# Allegro board 980K2-260817_261115-1.brd
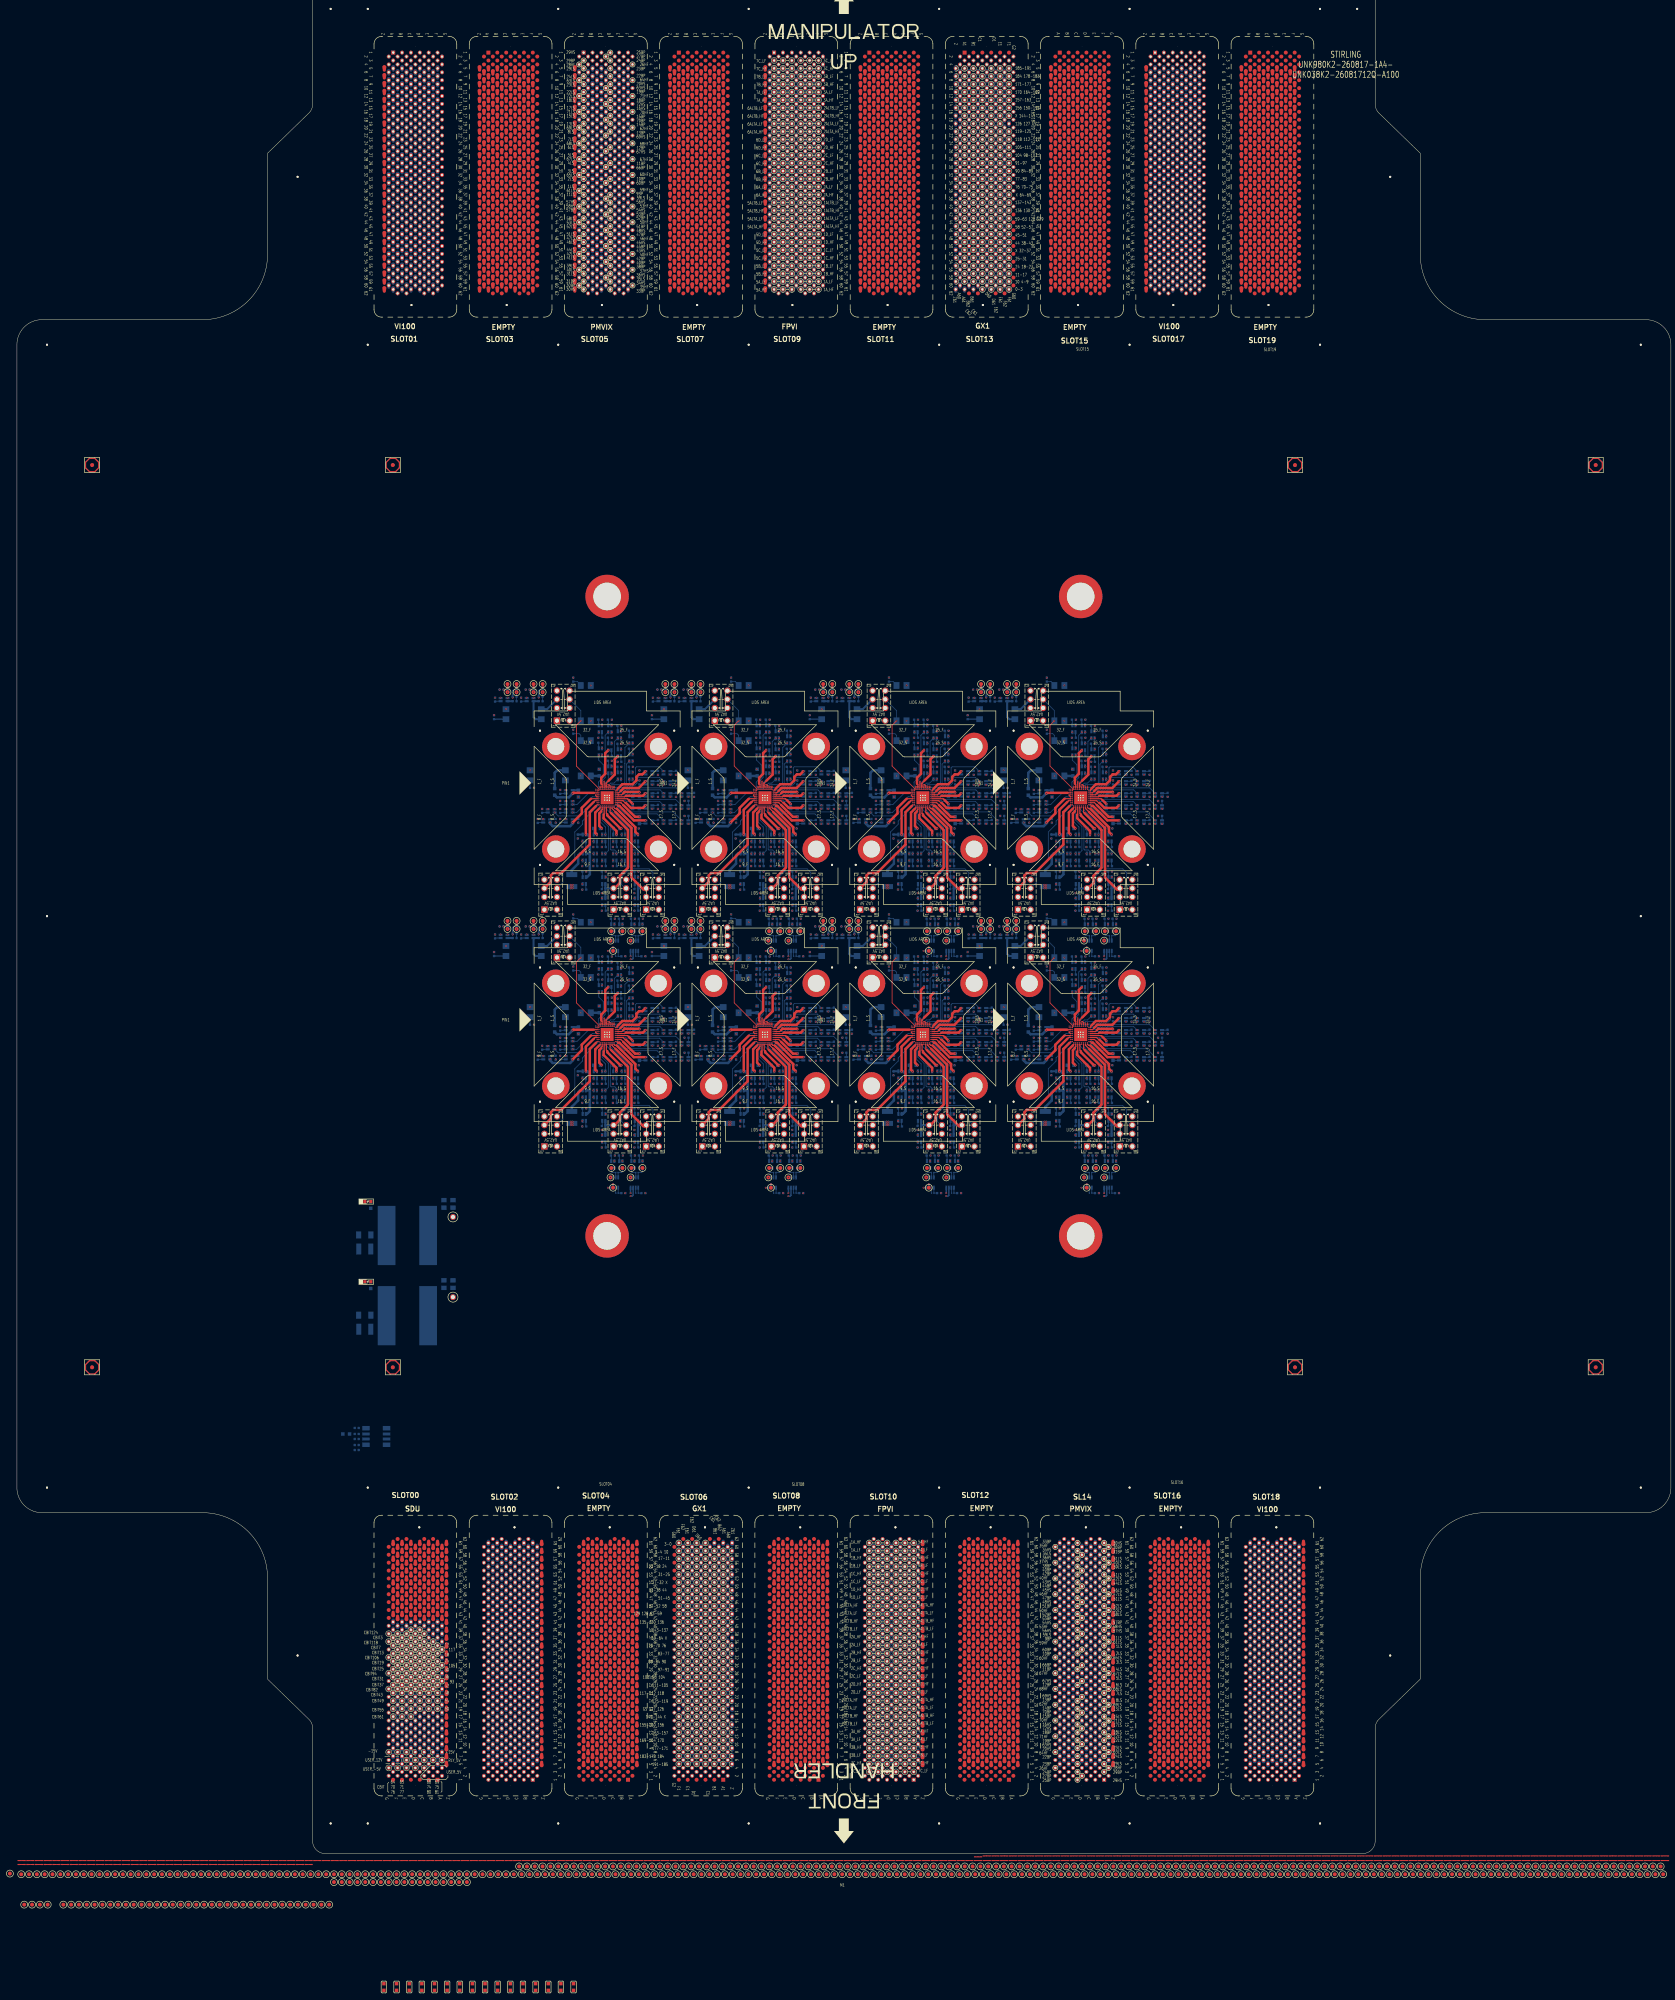
[diagram p0: board, top side]
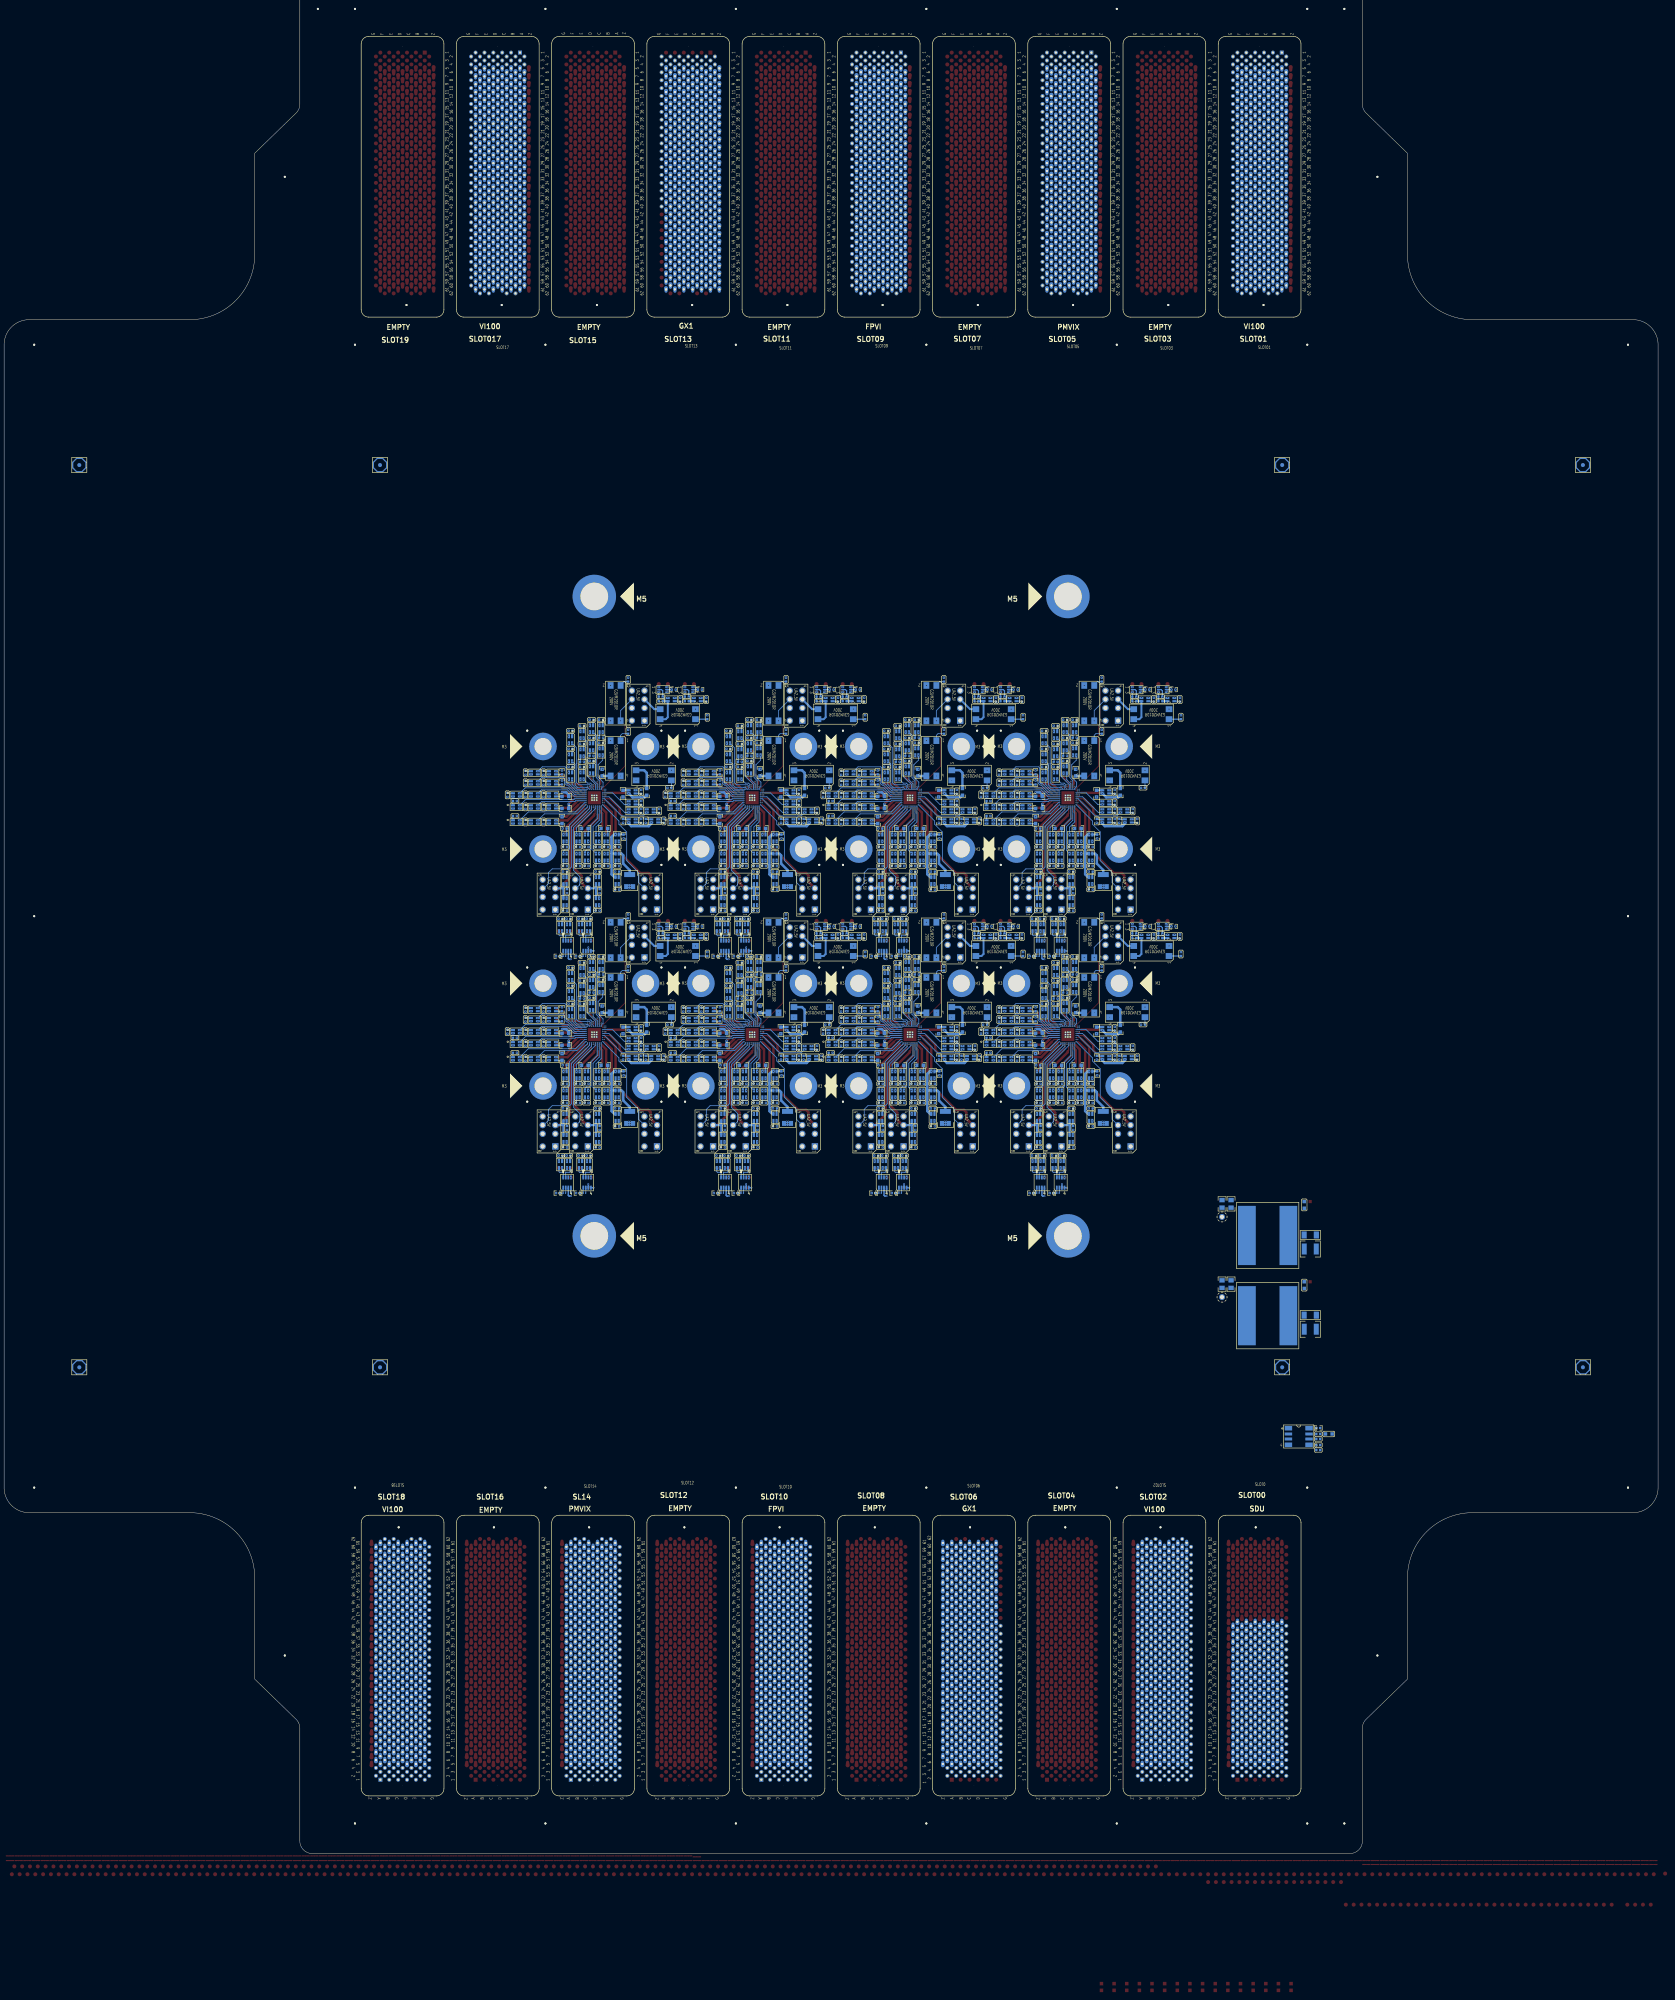
[diagram p1: board, bottom side, seen from below]

Outline 419.1 x 474.98 mm; copper layers: TOP, L02_GND, L03_DP, L04_GND, L05_DP, L06_GND, L07_VI, L08_GND, L09_VI, L10_GND, L11_VI, L12_GND, L13_VI, L14_GND, L15_5V, L16_5V, L17_C-BIT, L18_C-BIT, L19_GND, L20_VI, L21_GND, L22_VI, L23_GND, L24_VI, L25_GND, L26_VI, L27_GND, L28_DP, L29_GND, L30_DP, L31_GND, BOTTOM. Coordinates in mm from the lower left corner of the outline.

## Placement (name value [footprint] x y rotation side)
BC9  0.1U-50-X-S4-TDK  [C0402]  86.11 107.82 180 bottom
BR5  1K-1-S4  [R0402]  86.11 106.3 0 bottom
BR6  1K-1-S4  [R0402]  86.11 103.5 0 bottom
BR7  0-5-S6  [R0603]  83.44 106.3 180 bottom
BR8  0-5-S4  [R0402]  86.11 105.03 180 bottom
BR9  0-5-S4  [R0402]  86.11 102.24 180 bottom
BU1  AT24C512C-SSHM-T-SOIC8  [SO8_206X127MM]  91.06 105.66 180 bottom
C48  0.01U-100-X7R-S6-MU  [C0603]  147.57 273.87 90 bottom
C49  0.01U-100-X7R-S6-MU  [C0603]  136.27 268.99 270 bottom
C50  0.01U-100-X7R-S6-MU  [C0603]  142.28 268.54 270 bottom
C53  1U-16-X5R-S4-YA  [C0402]  142.24 261.62 270 bottom
C54  2.2U-16-X-S4-MU  [C0402]  136.53 261.62 270 bottom
C58  1U-16-X5R-S4-YA  [C0402]  142.11 257.68 270 bottom
C59  4.7U-100-X-SB-MU  [C1210]  140.59 246.51 270 bottom
C60  0.01U-100-X7R-S6-MU  [C0603]  147.01 259.72 0 bottom
C61  0.01U-100-X7R-S6-MU  [C0603]  156.88 264.78 180 bottom
C62  2.2U-16-X-S4-MU  [C0402]  157.07 259.72 0 bottom
C63  0.01U-100-X7R-S6-MU  [C0603]  157.73 261.82 90 bottom
C64  0.01U-100-X7R-S6-MU  [C0603]  156.88 267.82 180 bottom
C65  0.1U-25-X7R-S4-MU  [C0402]  157.73 271.37 90 bottom
C66  0.1U-25-X7R-S4-MU  [C0402]  152.65 276.61 180 bottom
C67  0.1U-25-X7R-S4-MU  [C0402]  150.24 278.13 180 bottom
C68  0.1U-25-X7R-S4-MU  [C0402]  147.83 282.7 180 bottom
C69  0.01U-100-X7R-S6-MU  [C0603]  151.96 259.72 0 bottom
C70  0.1U-25-X7R-S4-MU  [C0402]  122.8 294.89 180 bottom
C71  0.1U-25-X7R-S4-MU  [C0402]  129.42 294.89 180 bottom
C72  0.1U-25-X7R-S4-MU  [C0402]  158.75 227.33 0 bottom
C73  0.1U-25-X7R-S4-MU  [C0402]  153.67 227.33 0 bottom
C74  0.1U-25-X7R-S4-MU  [C0402]  157.73 273.91 90 bottom
CT1  47U-16-X5R-SB-MU  [C1210]  88.14 153.16 180 bottom
CT2  10U-16-X5R-S8-TY  [C0805]  108.2 164.59 90 bottom
CT3  22U-16-X-S8-MU  [C0805]  110.49 164.59 90 bottom
CT7  47U-16-X5R-SB-MU  [C1210]  88.14 132.84 180 bottom
CT8  10U-16-X5R-S8-TY  [C0805]  110.49 144.27 90 bottom
CT9  22U-16-X-S8-MU  [C0805]  108.2 144.27 90 bottom
F1  C1F8-0.25A-SA  [FUSE_1206_H1P05MM]  88.14 156.72 0 bottom
F2  C1F8-0.25A-SA  [FUSE_1206_H1P05MM]  88.14 136.4 0 bottom
FD1  -  [FD_040_V2]  95.25 123.19 0 top
FD2  -  [FD_040_V2]  323.85 123.19 0 top
FD3  -  [FD_040_V2]  323.85 351.79 0 top
FD4  -  [FD_040_V2]  95.25 351.79 0 top
FD5  -  [FD_040_V2]  323.85 123.19 180 bottom
FD6  -  [FD_040_V2]  95.25 123.19 180 bottom
FD7  -  [FD_040_V2]  95.25 351.79 180 bottom
FD8  -  [FD_040_V2]  323.85 351.79 180 bottom
FD9  -  [FD_040_V2]  19.05 123.19 0 top
FD10  -  [FD_040_V2]  400.05 123.19 0 top
FD11  -  [FD_040_V2]  400.05 351.79 0 top
FD12  -  [FD_040_V2]  19.05 351.79 0 top
FD13  -  [FD_040_V2]  400.05 123.19 180 bottom
FD14  -  [FD_040_V2]  19.05 123.19 180 bottom
FD15  -  [FD_040_V2]  19.05 351.79 180 bottom
FD16  -  [FD_040_V2]  400.05 351.79 180 bottom
K1  UA2-5NJ-A-V3  [RL_NECUA2_5V_V3]  138.43 290.63 270 bottom
K2  G3VM-201DR  [RL_G3VM201DR_200V]  144.15 277.5 0 bottom
K3  G3VM-201DR  [RL_G3VM201DR_200V]  134.49 273.18 90 bottom
K4  G3VM-201DR  [RL_G3VM201DR_200V]  144.15 291.47 0 bottom
K5  G3VM-51UR-5V-VSON4  [RL_G3VM_4P_VSON4]  139.95 268.99 0 bottom
K6  G3VM-51UR-5V-VSON4  [RL_G3VM_4P_VSON4]  139.95 266.19 0 bottom
K7  G3VM-51UR-5V-VSON4  [RL_G3VM_4P_VSON4]  139.95 264.16 0 bottom
K8  G3VM-51UR-5V-VSON4  [RL_G3VM_4P_VSON4]  139.95 261.62 0 bottom
K9  G3VM-51UR-5V-VSON4  [RL_G3VM_4P_VSON4]  134.24 261.62 0 bottom
K10  G3VM-51UR-5V-VSON4  [RL_G3VM_4P_VSON4]  135.38 264.16 0 bottom
K11  G3VM-51UR-5V-VSON4  [RL_G3VM_4P_VSON4]  143.76 257.3 90 bottom
K12  G3VM-51UR-5V-VSON4  [RL_G3VM_4P_VSON4]  143.76 252.48 90 bottom
K13  G3VM-51UR-5V-VSON4  [RL_G3VM_4P_VSON4]  143.76 246.51 90 bottom
K14  G3VM-51UR-5V-VSON4  [RL_G3VM_4P_VSON4]  146.56 252.48 90 bottom
K15  UA2-5NJ-A-V3  [RL_NECUA2_5V_V3]  135.25 242.75 270 bottom
K16  G3VM-51UR-5V-VSON4  [RL_G3VM_4P_VSON4]  146.56 257.3 90 bottom
K17  G3VM-51UR-5V-VSON4  [RL_G3VM_4P_VSON4]  148.72 257.3 90 bottom
K18  G3VM-51UR-5V-VSON4  [RL_G3VM_4P_VSON4]  148.72 252.48 90 bottom
K19  G3VM-51UR-5V-VSON4  [RL_G3VM_4P_VSON4]  151.51 257.3 90 bottom
K20  G3VM-51UR-5V-VSON4  [RL_G3VM_4P_VSON4]  151.51 252.48 90 bottom
K21  G3VM-51UR-5V-VSON4  [RL_G3VM_4P_VSON4]  153.67 257.3 90 bottom
K22  G3VM-51UR-5V-VSON4  [RL_G3VM_4P_VSON4]  153.67 252.48 90 bottom
K23  UA2-5NJ-A-V3  [RL_NECUA2_5V_V3]  152.78 242.75 270 bottom
K24  UA2-5NJ-A-V3  [RL_NECUA2_5V_V3]  161.04 242.75 270 bottom
K25  G3VM-51UR-5V-VSON4  [RL_G3VM_4P_VSON4]  156.97 257.3 90 bottom
K26  G3VM-51UR-5V-VSON4  [RL_G3VM_4P_VSON4]  156.97 252.48 90 bottom
K27  G3VM-51UR-5V-VSON4  [RL_G3VM_4P_VSON4]  160.15 261.37 180 bottom
K28  G3VM-51UR-5V-VSON4  [RL_G3VM_4P_VSON4]  164.72 261.37 180 bottom
K29  G3VM-51UR-5V-VSON4  [RL_G3VM_4P_VSON4]  169.29 261.37 180 bottom
K30  G3VM-51UR-5V-VSON4  [RL_G3VM_4P_VSON4]  160.15 265.18 180 bottom
K31  G3VM-51UR-5V-VSON4  [RL_G3VM_4P_VSON4]  164.72 265.18 180 bottom
K32  G3VM-51UR-5V-VSON4  [RL_G3VM_4P_VSON4]  169.29 265.18 180 bottom
K33  G3VM-51UR-5V-VSON4  [RL_G3VM_4P_VSON4]  160.15 268.22 180 bottom
K34  G3VM-51UR-5V-VSON4  [RL_G3VM_4P_VSON4]  164.72 268.22 180 bottom
K35  G3VM-51UR-5V-VSON4  [RL_G3VM_4P_VSON4]  169.29 268.22 180 bottom
K36  G3VM-51UR-5V-VSON4  [RL_G3VM_4P_VSON4]  160.15 271.27 180 bottom
K37  G3VM-51UR-5V-VSON4  [RL_G3VM_4P_VSON4]  164.72 271.27 180 bottom
K38  G3VM-51UR-5V-VSON4  [RL_G3VM_4P_VSON4]  160.15 273.81 180 bottom
K39  G3VM-51UR-5V-VSON4  [RL_G3VM_4P_VSON4]  164.72 273.81 180 bottom
K40  G3VM-51UR-5V-VSON4  [RL_G3VM_4P_VSON4]  155.58 273.05 270 bottom
K41  G3VM-51UR-5V-VSON4  [RL_G3VM_4P_VSON4]  155.58 277.62 270 bottom
K42  G3VM-51UR-5V-VSON4  [RL_G3VM_4P_VSON4]  155.58 282.19 270 bottom
K43  G3VM-51UR-5V-VSON4  [RL_G3VM_4P_VSON4]  152.65 273.05 270 bottom
K44  G3VM-51UR-5V-VSON4  [RL_G3VM_4P_VSON4]  152.65 278.89 270 bottom
K45  G3VM-51UR-5V-VSON4  [RL_G3VM_4P_VSON4]  152.65 283.46 270 bottom
K46  G3VM-51UR-5V-VSON4  [RL_G3VM_4P_VSON4]  150.24 274.57 270 bottom
K47  G3VM-51UR-5V-VSON4  [RL_G3VM_4P_VSON4]  150.24 280.42 270 bottom
K48  G3VM-51UR-5V-VSON4  [RL_G3VM_4P_VSON4]  150.24 284.99 270 bottom
K49  G3VM-51UR-5V-VSON4  [RL_G3VM_4P_VSON4]  147.83 284.99 270 bottom
K50  G3VM-51UR-5V-VSON4  [RL_G3VM_4P_VSON4]  147.83 279.15 270 bottom
K51  G3VM-51UR-5V-VSON4  [RL_G3VM_4P_VSON4]  148.72 246.51 270 bottom
K52  G3VM-51UR-5V-VSON4  [RL_G3VM_4P_VSON4]  148.72 241.17 90 bottom
K53  G3VM-51UR-5V-VSON4  [RL_G3VM_4P_VSON4]  156.97 246.51 270 bottom
K54  G3VM-51UR-5V-VSON4  [RL_G3VM_4P_VSON4]  156.97 241.17 90 bottom
K55  G3VM-51UR-5V-VSON4  [RL_G3VM_4P_VSON4]  123.44 292.35 0 bottom
K56  G3VM-201DR  [RL_G3VM201DR_200V]  128.4 288.67 90 bottom
K57  G3VM-51UR-5V-VSON4  [RL_G3VM_4P_VSON4]  158.12 234.57 270 bottom
K58  G3VM-51UR-5V-VSON4  [RL_G3VM_4P_VSON4]  156.08 234.57 270 bottom
K59  G3VM-51UR-5V-VSON4  [RL_G3VM_4P_VSON4]  153.04 234.57 270 bottom
K60  G3VM-51UR-5V-VSON4  [RL_G3VM_4P_VSON4]  151 234.57 270 bottom
K61  G3VM-51UR-5V-VSON4  [RL_G3VM_4P_VSON4]  130.05 292.35 0 bottom
LD1  LDG-2-S6  [LED_0603]  88.91 165.19 0 top
LD3  LDG-2-S6  [LED_0603]  88.91 144.87 0 top
LT1  L10U-16A-S16.5X15.5-PU  [IND_16P5X15P5MM]  98.93 156.59 0 bottom
LT3  L10U-16A-S16.5X15.5-PU  [IND_16P5X15P5MM]  98.93 136.27 0 bottom
M1  PG_LTXDX_F_X1_OUTLINE_TD_V2  [PG_LTXDX_F_X1_OUTLINE_TD_COHU]  209.55 237.49 0 top
NOREF  -  []  169.17 291.95 0 top
NOREF#2  -  []  231.73 172.54 0 top
NOREF#3  -  []  189.72 281.62 0 top
NOREF#4  -  []  228.32 253.35 0 top
NOREF#5  -  []  272.25 282.59 0 top
NOREF#6  -  []  233.18 211.85 90 top
NOREF#7  -  []  153.27 193.35 0 top
NOREF#8  -  []  288.39 456.29 0 top
NOREF#9  -  []  230.6 173.69 0 top
NOREF#10  -  []  192.66 226.35 90 top
NOREF#11  -  []  230.15 266.89 90 top
NOREF#12  -  []  203.92 229.94 0 top
NOREF#13  -  []  190.97 190.88 90 top
NOREF#14  -  []  249.52 210.32 90 top
NOREF#15  -  []  288.37 18.69 0 top
NOREF#16  -  []  203.97 204.45 90 top
NOREF#17  -  []  266.16 193.35 0 top
NOREF#18  -  []  232.63 233.69 90 top
NOREF#19  -  []  279.06 238.07 0 top
NOREF#20  -  []  163.97 210.55 90 top
NOREF#21  -  []  247.95 226.12 90 top
NOREF#22  -  []  243.97 272 0 top
NOREF#23  -  []  225.61 252.78 0 top
NOREF#24  -  []  302.59 389.27 90 top
NOREF#25  -  []  286.32 272.22 0 top
NOREF#26  -  []  180.83 208.59 90 top
NOREF#27  -  []  199.72 274.65 90 top
NOREF#28  -  []  209.49 280.89 0 top
NOREF#29  -  []  214.51 263.76 0 top
NOREF#30  -  []  186.28 193.03 90 top
NOREF#31  -  []  201.84 235.2 0 top
NOREF#32  -  []  154.39 226.59 90 top
NOREF#33  -  []  239.4 205.9 0 top
NOREF#34  -  []  240.13 396.29 0 top
NOREF#35  -  []  279.27 260.97 90 top
NOREF#36  -  []  179.72 273.6 90 top
NOREF#37  -  []  140.83 201.22 90 top
NOREF#38  -  []  150.6 173.69 90 top
NOREF#39  -  []  190.77 279.22 90 top
NOREF#40  -  []  198.47 82.65 0 top
NOREF#41  -  []  239.72 274.65 90 top
NOREF#42  -  []  201.75 209.17 0 top
NOREF#43  -  []  146.96 191.6 90 top
NOREF#44  -  []  290.89 269.17 0 top
NOREF#45  -  []  176.63 292.23 0 top
NOREF#46  -  []  226.28 253.03 90 top
NOREF#47  -  []  231.24 253.03 90 top
NOREF#48  -  []  213.64 299.09 0 top
NOREF#49  -  []  140.95 204.09 90 top
NOREF#50  -  []  290.89 262.32 0 top
NOREF#51  -  []  269.67 190.01 0 top
NOREF#52  -  []  214.38 204.09 0 top
NOREF#53  -  []  213.75 452.29 90 top
NOREF#54  -  []  197.47 17.15 0 top
NOREF#55  -  []  150.56 247.68 0 top
NOREF#56  -  []  230.77 273.37 90 top
NOREF#57  -  []  149.84 213.7 0 top
NOREF#58  -  []  164.95 272.86 90 top
NOREF#59  -  []  248.42 208.62 0 top
NOREF#60  -  []  203.84 208.62 0 top
NOREF#61  -  []  157.37 196.43 90 top
NOREF#62  -  []  202.57 291.95 0 top
NOREF#63  -  []  212.87 227.4 90 top
NOREF#64  -  []  214.43 292.23 0 top
NOREF#65  -  []  251.65 293.3 90 top
NOREF#66  -  []  277.25 251.93 0 top
NOREF#67  -  []  224.04 196.75 0 top
NOREF#68  -  []  191.11 193.35 0 top
NOREF#69  -  []  257.25 176.5 90 top
NOREF#70  -  []  233.76 255.7 90 top
NOREF#71  -  []  231.95 238.07 0 top
NOREF#72  -  []  191.91 251.6 90 top
NOREF#73  -  []  281.41 227.9 90 top
NOREF#74  -  []  264.26 456.29 0 top
NOREF#75  -  []  145.61 254.08 0 top
NOREF#76  -  []  156.38 241.15 90 top
NOREF#77  -  []  181.55 205.11 90 top
NOREF#78  -  []  214.43 232.23 0 top
NOREF#79  -  []  131.26 244.35 0 top
NOREF#80  -  []  268.78 244.35 0 top
NOREF#81  -  []  195.17 221.32 90 top
NOREF#82  -  []  259.72 213.6 90 top
NOREF#83  -  []  237.25 196.75 0 top
NOREF#84  -  []  192.25 222.59 90 top
NOREF#85  -  []  204.95 260.42 90 top
NOREF#86  -  []  195.68 233.69 90 top
NOREF#87  -  []  144.04 191.93 0 top
NOREF#88  -  []  266.16 200.17 90 top
NOREF#89  -  []  276.57 245.63 0 top
NOREF#90  -  []  226.01 255.7 90 top
NOREF#91  -  []  176.83 227.03 0 top
NOREF#92  -  []  196.81 232.54 0 top
NOREF#93  -  []  180.43 284.38 90 top
NOREF#94  -  []  165.04 293.3 90 top
NOREF#95  -  []  229.72 275.77 0 top
NOREF#96  -  []  212.64 264.47 0 top
NOREF#97  -  []  274.07 191.6 90 top
NOREF#98  -  []  233.76 250.88 90 top
NOREF#99  -  []  273.18 282.26 90 top
NOREF#100  -  []  250.89 202.32 0 top
NOREF#101  -  []  226.16 253.35 0 top
NOREF#102  -  []  161.75 206.13 0 top
NOREF#103  -  []  228.19 187.71 0 top
NOREF#104  -  []  230.77 279.22 90 top
NOREF#105  -  []  147.03 231.4 0 top
NOREF#106  -  []  236.8 285.06 90 top
NOREF#107  -  []  288.42 205.58 0 top
NOREF#108  -  []  268.35 217.95 90 top
NOREF#109  -  []  188.99 256.75 0 top
NOREF#110  -  []  191.98 280.75 90 top
NOREF#111  -  []  258.35 207.01 0 top
NOREF#112  -  []  276.81 172.54 0 top
NOREF#113  -  []  218.97 271.91 90 top
NOREF#114  -  []  263.36 193.35 0 top
NOREF#115  -  []  125.25 291.4 0 top
NOREF#116  -  []  185.41 213.02 90 top
NOREF#117  -  []  148.32 182.05 0 top
NOREF#118  -  []  154.33 207.37 90 top
NOREF#119  -  []  196.57 245.63 0 top
NOREF#120  -  []  136.5 271.94 0 top
NOREF#121  -  []  143.89 185.24 90 top
NOREF#122  -  []  80.49 155.57 0 top
NOREF#123  -  []  155.17 212.18 0 top
NOREF#124  -  []  231.76 227.33 0 top
NOREF#125  -  []  187.8 265.39 90 top
NOREF#126  -  []  201.84 295.2 0 top
NOREF#127  -  []  216 396.29 0 top
NOREF#128  -  []  164.44 292.28 90 top
NOREF#129  -  []  273.6 282.39 0 top
NOREF#130  -  []  244.95 264.23 90 top
NOREF#131  -  []  272.13 224.66 0 top
NOREF#132  -  []  183.36 247.38 0 top
NOREF#133  -  []  294.09 207.27 90 top
NOREF#134  -  []  187.9 265.84 90 top
NOREF#135  -  []  227.77 192.78 0 top
NOREF#136  -  []  251.21 234.89 90 top
NOREF#137  -  []  249.52 200.42 90 top
NOREF#138  -  []  286.32 202.32 0 top
NOREF#139  -  []  233.27 198.18 0 top
NOREF#140  -  []  247.98 286.38 90 top
NOREF#141  -  []  148.44 253.03 90 top
NOREF#142  -  []  188.32 245.63 0 top
NOREF#143  -  []  140.95 201.55 90 top
NOREF#144  -  []  250.02 274.45 0 top
NOREF#145  -  []  234.39 276.17 90 top
NOREF#146  -  []  209.55 237.49 0 top
NOREF#147  -  []  235.17 221.32 90 top
NOREF#148  -  []  226.16 258.18 0 top
NOREF#149  -  []  178.83 292.23 0 top
NOREF#150  -  []  288.42 207.82 90 top
NOREF#151  -  []  147.43 224.11 0 top
NOREF#152  -  []  156.57 245.63 90 top
NOREF#153  -  []  157.18 176.17 90 top
NOREF#154  -  []  197.71 233.69 90 top
NOREF#155  -  []  155.56 175.77 0 top
NOREF#156  -  []  235.15 236.17 90 top
NOREF#157  -  []  180.83 203.76 90 top
NOREF#158  -  []  259.08 208.59 0 top
NOREF#159  -  []  178.35 269.04 0 top
NOREF#160  -  []  249.05 232.28 0 top
NOREF#161  -  []  157.74 166.36 90 top
NOREF#162  -  []  270.77 213.37 90 top
NOREF#163  -  []  197.5 185.31 90 top
NOREF#164  -  []  248.45 295.2 0 top
NOREF#165  -  []  236.57 258.18 0 top
NOREF#166  -  []  193.95 251.93 0 top
NOREF#167  -  []  279.27 265.58 0 top
NOREF#168  -  []  142.88 226.99 0 top
NOREF#169  -  []  136.55 280.49 0 top
NOREF#170  -  []  187.8 204.99 90 top
NOREF#171  -  []  283.97 213.09 90 top
NOREF#172  -  []  199.27 208.62 0 top
NOREF#173  -  []  143.49 197.85 90 top
NOREF#174  -  []  139.08 208.59 0 top
NOREF#175  -  []  220.83 208.59 90 top
NOREF#176  -  []  253.36 201.22 0 top
NOREF#177  -  []  243.97 208.95 0 top
NOREF#178  -  []  239.22 190.88 90 top
NOREF#179  -  []  277.25 180.62 0 top
NOREF#180  -  []  267.3 280.35 0 top
NOREF#181  -  []  163.84 210.87 90 top
NOREF#182  -  []  324.88 21.69 90 top
NOREF#183  -  []  197.25 240.62 0 top
NOREF#184  -  []  184.16 245.63 90 top
NOREF#185  -  []  251.36 18.69 90 top
NOREF#186  -  []  239.72 219.22 90 top
NOREF#187  -  []  288.54 202.09 0 top
NOREF#188  -  []  155.17 221.32 0 top
NOREF#189  -  []  279.4 212 0 top
NOREF#190  -  []  208.42 207.82 90 top
NOREF#191  -  []  259.72 273.6 90 top
NOREF#192  -  []  178.95 208.91 0 top
NOREF#193  -  []  192.25 272.17 90 top
NOREF#194  -  []  168.54 205.9 0 top
NOREF#195  -  []  163.97 267.5 90 top
NOREF#196  -  []  326.72 389.27 90 top
NOREF#197  -  []  142.03 229.03 90 top
NOREF#198  -  []  243.84 271.67 0 top
NOREF#199  -  []  140.83 268.59 90 top
NOREF#200  -  []  131.05 232.28 90 top
NOREF#201  -  []  235.17 272.17 0 top
NOREF#202  -  []  146.43 236.47 90 top
NOREF#203  -  []  243.97 210.55 90 top
NOREF#204  -  []  151.11 253.35 0 top
NOREF#205  -  []  203.84 274.21 0 top
NOREF#206  -  []  140.59 184.98 90 top
NOREF#207  -  []  239.24 184.35 0 top
NOREF#208  -  []  263.36 247.38 0 top
NOREF#209  -  []  197.25 256.75 0 top
NOREF#210  -  []  243.97 260.64 90 top
NOREF#211  -  []  270.48 175.77 0 top
NOREF#212  -  []  187.8 269.99 0 top
NOREF#213  -  []  188.81 250.88 90 top
NOREF#214  -  []  229.12 251.6 90 top
NOREF#215  -  []  147.43 284.11 90 top
NOREF#216  -  []  159.65 272.56 0 top
NOREF#217  -  []  151.98 220.75 90 top
NOREF#218  -  []  249.17 231.95 0 top
NOREF#219  -  []  213.78 207.01 0 top
NOREF#220  -  []  198.91 172.21 90 top
NOREF#221  -  []  188.32 253.35 0 top
NOREF#222  -  []  201.75 269.17 0 top
NOREF#223  -  []  211.21 294.89 90 top
NOREF#224  -  []  179.72 213.6 90 top
NOREF#225  -  []  203.04 176.5 90 top
NOREF#226  -  []  225.61 197.6 0 top
NOREF#227  -  []  237.74 226.35 90 top
NOREF#228  -  []  157.03 178.07 0 top
NOREF#229  -  []  271.11 260.17 90 top
NOREF#230  -  []  190.56 252.78 0 top
NOREF#231  -  []  209.52 272.86 90 top
NOREF#232  -  []  246.32 202.32 0 top
NOREF#233  -  []  179.08 205.79 0 top
NOREF#234  -  []  179.73 238.35 0 top
NOREF#235  -  []  267.05 269.24 0 top
NOREF#236  -  []  224.04 185.96 0 top
NOREF#237  -  []  288.42 265.58 0 top
NOREF#238  -  []  221.55 262.57 90 top
NOREF#239  -  []  156.7 181.72 90 top
NOREF#240  -  []  197.47 17.15 90 top
NOREF#241  -  []  231.91 256.43 90 top
NOREF#242  -  []  215.84 262.57 90 top
NOREF#243  -  []  225.41 286.99 90 top
NOREF#244  -  []  243.84 273.41 90 top
NOREF#245  -  []  268.78 222.65 0 top
NOREF#246  -  []  228.32 258.18 0 top
NOREF#247  -  []  239.22 195.7 90 top
NOREF#248  -  []  254.43 292.23 0 top
NOREF#249  -  []  184.04 185.96 0 top
NOREF#250  -  []  176.72 18.69 0 top
NOREF#251  -  []  149.84 224.11 0 top
NOREF#252  -  []  199.4 204.45 90 top
NOREF#253  -  []  241.75 266.13 0 top
NOREF#254  -  []  191.98 226.59 90 top
NOREF#255  -  []  196.1 271.85 90 top
NOREF#256  -  []  151.24 253.03 90 top
NOREF#257  -  []  183.89 245.24 90 top
NOREF#258  -  []  204.64 241.15 90 top
NOREF#259  -  []  197.37 251.6 90 top
NOREF#260  -  []  155.97 21.69 90 top
NOREF#261  -  []  157.04 244.35 0 top
NOREF#262  -  []  159.22 195.7 90 top
NOREF#263  -  []  137.28 272.5 0 top
NOREF#264  -  []  267.45 209.24 0 top
NOREF#265  -  []  283.84 273.41 90 top
NOREF#266  -  []  276.02 241.47 0 top
NOREF#267  -  []  145.09 257.49 90 top
NOREF#268  -  []  242.26 236.17 90 top
NOREF#269  -  []  228.99 240.62 0 top
NOREF#270  -  []  193.18 282.26 90 top
NOREF#271  -  []  239.27 264.78 90 top
NOREF#272  -  []  119.48 456.29 90 top
NOREF#273  -  []  231.98 220.75 90 top
NOREF#274  -  []  174.09 207.27 90 top
NOREF#275  -  []  203.84 273.41 90 top
NOREF#276  -  []  149.67 190.01 0 top
NOREF#277  -  []  196.45 247.71 0 top
NOREF#278  -  []  277.37 240.3 90 top
NOREF#279  -  []  264.04 245.96 0 top
NOREF#280  -  []  162.87 16.49 0 top
NOREF#281  -  []  268.78 228.49 0 top
NOREF#282  -  []  153.6 222.39 0 top
NOREF#283  -  []  232.25 278.02 0 top
NOREF#284  -  []  178.83 232.23 0 top
NOREF#285  -  []  157.25 256.75 0 top
NOREF#286  -  []  236.7 241.72 90 top
NOREF#287  -  []  232.25 222.59 0 top
NOREF#288  -  []  276.1 276.42 90 top
NOREF#289  -  []  271.91 196.43 90 top
NOREF#290  -  []  185.09 197.49 90 top
NOREF#291  -  []  281.12 188.11 90 top
NOREF#292  -  []  192.63 233.69 0 top
NOREF#293  -  []  169.05 292.28 0 top
NOREF#294  -  []  283.84 260.97 90 top
NOREF#295  -  []  249.52 212.86 90 top
NOREF#296  -  []  159.72 219.22 90 top
NOREF#297  -  []  151.53 233.37 90 top
NOREF#298  -  []  234.78 236.5 90 top
NOREF#299  -  []  269.24 185.31 90 top
NOREF#300  -  []  148.78 184.35 0 top
NOREF#301  -  []  279.4 268.95 0 top
NOREF#302  -  []  253.64 239.09 0 top
NOREF#303  -  []  156.38 181.15 90 top
NOREF#304  -  []  199.72 214.65 90 top
NOREF#305  -  []  164.44 232.28 90 top
NOREF#306  -  []  149.29 279.37 0 top
NOREF#307  -  []  134.07 210.89 90 top
NOREF#308  -  []  269.84 213.7 90 top
NOREF#309  -  []  143.61 396.29 0 top
NOREF#310  -  []  231.19 228.49 0 top
NOREF#311  -  []  171.22 234.24 90 top
NOREF#312  -  []  136.55 194.49 90 top
NOREF#313  -  []  268.32 245.63 0 top
NOREF#314  -  []  125.38 226.23 0 top
NOREF#315  -  []  231.24 193.03 90 top
NOREF#316  -  []  186.83 191.93 0 top
NOREF#317  -  []  186.83 256.75 0 top
NOREF#318  -  []  209.52 204.23 90 top
NOREF#319  -  []  196.52 221.12 0 top
NOREF#320  -  []  242.44 292.28 0 top
NOREF#321  -  []  195.17 272.17 0 top
NOREF#322  -  []  163.97 268.95 0 top
NOREF#323  -  []  230.48 235.77 0 top
NOREF#324  -  []  218.95 266.12 0 top
NOREF#325  -  []  191.95 178.07 0 top
NOREF#326  -  []  199.27 213.41 90 top
NOREF#327  -  []  248.42 267.82 90 top
NOREF#328  -  []  277.03 178.07 0 top
NOREF#329  -  []  277.25 191.93 0 top
NOREF#330  -  []  271.11 258.18 0 top
NOREF#331  -  []  138.35 209.04 0 top
NOREF#332  -  []  235.05 218.82 0 top
NOREF#333  -  []  275.51 454.29 90 top
NOREF#334  -  []  258.85 181.15 90 top
NOREF#335  -  []  260.95 201.55 90 top
NOREF#336  -  []  135.15 268.04 0 top
NOREF#337  -  []  163.84 270.87 90 top
NOREF#338  -  []  262.81 257.6 0 top
NOREF#339  -  []  132.26 237.5 0 top
NOREF#340  -  []  231.53 233.37 90 top
NOREF#341  -  []  239.72 279.22 90 top
NOREF#342  -  []  192.25 278.02 90 top
NOREF#343  -  []  138.56 246.51 0 top
NOREF#344  -  []  279.06 178.07 0 top
NOREF#345  -  []  226.83 196.75 0 top
NOREF#346  -  []  175.84 202.57 90 top
NOREF#347  -  []  323.77 454.29 90 top
NOREF#348  -  []  271.76 227.33 0 top
NOREF#349  -  []  232.66 226.35 90 top
NOREF#350  -  []  274.39 282.02 90 top
NOREF#351  -  []  228.78 244.35 0 top
NOREF#352  -  []  279.44 179.15 0 top
NOREF#353  -  []  222.03 289.03 90 top
NOREF#354  -  []  190.77 219.22 90 top
NOREF#355  -  []  134.43 232.23 0 top
NOREF#356  -  []  152.72 192.78 0 top
NOREF#357  -  []  258.35 264.47 0 top
NOREF#358  -  []  155.15 176.17 90 top
NOREF#359  -  []  191.19 278.07 0 top
NOREF#360  -  []  136.38 204.09 90 top
NOREF#361  -  []  165.04 233.3 90 top
NOREF#362  -  []  124.11 392.33 90 top
NOREF#363  -  []  236.57 185.63 0 top
NOREF#364  -  []  88.44 107.76 0 top
NOREF#365  -  []  134.38 204.09 0 top
NOREF#366  -  []  267.43 224.11 0 top
NOREF#367  -  []  239.4 208.95 0 top
NOREF#368  -  []  203.84 214.21 0 top
NOREF#369  -  []  239.4 262.09 0 top
NOREF#370  -  []  275.92 255.7 90 top
NOREF#371  -  []  276.02 252.78 0 top
NOREF#372  -  []  157.04 184.35 0 top
NOREF#373  -  []  156.52 216.55 0 top
NOREF#374  -  []  221.59 234.15 0 top
NOREF#375  -  []  222.81 186.81 0 top
NOREF#376  -  []  294.09 260.42 90 top
NOREF#377  -  []  163.84 201.77 0 top
NOREF#378  -  []  276.8 285.06 90 top
NOREF#379  -  []  195.05 223.39 0 top
NOREF#380  -  []  227.43 284.11 0 top
NOREF#381  -  []  151.11 200.17 90 top
NOREF#382  -  []  230.56 257.6 0 top
NOREF#383  -  []  149.21 17.15 0 top
NOREF#384  -  []  133.45 184.35 0 top
NOREF#385  -  []  284.95 260.42 90 top
NOREF#386  -  []  232.63 172.86 0 top
NOREF#387  -  []  152.13 280.09 0 top
NOREF#388  -  []  231.11 253.35 0 top
NOREF#389  -  []  269.84 224.11 0 top
NOREF#390  -  []  213.45 244.35 0 top
NOREF#391  -  []  186.96 191.6 90 top
NOREF#392  -  []  269.12 251.6 90 top
NOREF#393  -  []  224.16 251.6 90 top
NOREF#394  -  []  188.95 266.89 0 top
NOREF#395  -  []  266.96 256.43 90 top
NOREF#396  -  []  259.55 240.49 90 top
NOREF#397  -  []  130.02 214.45 0 top
NOREF#398  -  []  134.38 264.09 0 top
NOREF#399  -  []  157.59 175.77 0 top
NOREF#400  -  []  267.77 257.6 0 top
NOREF#401  -  []  246.32 274.76 0 top
NOREF#402  -  []  269.12 196.43 90 top
NOREF#403  -  []  219.08 261.22 0 top
NOREF#404  -  []  189.84 219.54 90 top
NOREF#405  -  []  195.68 173.69 0 top
NOREF#406  -  []  159.4 210.55 90 top
NOREF#407  -  []  175.24 201.55 90 top
NOREF#408  -  []  139.49 266.31 90 top
NOREF#409  -  []  191.91 256.43 90 top
NOREF#410  -  []  215.24 261.55 90 top
NOREF#411  -  []  283.97 272 0 top
NOREF#412  -  []  205.38 286.23 0 top
NOREF#413  -  []  267.9 205.84 90 top
NOREF#414  -  []  199.44 179.15 0 top
NOREF#415  -  []  258.83 232.23 0 top
NOREF#416  -  []  276.57 185.63 0 top
NOREF#417  -  []  186.28 197.85 90 top
NOREF#418  -  []  146.17 226.14 90 top
NOREF#419  -  []  192.25 222.59 0 top
NOREF#420  -  []  192.13 220.09 0 top
NOREF#421  -  []  279.4 267.5 90 top
NOREF#422  -  []  231.46 167 0 top
NOREF#423  -  []  147.9 205.84 90 top
NOREF#424  -  []  159.27 267.82 90 top
NOREF#425  -  []  155.05 278.82 0 top
NOREF#426  -  []  149.72 215.77 0 top
NOREF#427  -  []  14.6 372.12 0 top
NOREF#428  -  []  164.95 260.42 90 top
NOREF#429  -  []  228.99 256.75 0 top
NOREF#430  -  []  135.24 261.55 90 top
NOREF#431  -  []  173.78 267.01 0 top
NOREF#432  -  []  218.95 268.91 0 top
NOREF#433  -  []  141.55 205.11 90 top
NOREF#434  -  []  151.98 226.59 90 top
NOREF#435  -  []  234.39 282.02 90 top
NOREF#436  -  []  227.9 205.84 90 top
NOREF#437  -  []  275.68 233.69 90 top
NOREF#438  -  []  276.1 280.99 90 top
NOREF#439  -  []  231.24 257.85 90 top
NOREF#440  -  []  213.65 239.15 0 top
NOREF#441  -  []  204.64 181.15 90 top
NOREF#442  -  []  196.57 185.63 0 top
NOREF#443  -  []  193.18 277.69 90 top
NOREF#444  -  []  172.37 392.33 90 top
NOREF#445  -  []  219.72 213.6 90 top
NOREF#446  -  []  226.01 250.88 90 top
NOREF#447  -  []  233.6 282.39 0 top
NOREF#448  -  []  257.29 187.78 0 top
NOREF#449  -  []  196.84 227.33 0 top
NOREF#450  -  []  251.25 184.35 0 top
NOREF#451  -  []  192.13 280.09 0 top
NOREF#452  -  []  268.32 182.05 0 top
NOREF#453  -  []  149.12 251.6 90 top
NOREF#454  -  []  206.32 214.76 0 top
NOREF#455  -  []  258.95 268.91 0 top
NOREF#456  -  []  237.71 233.69 90 top
NOREF#457  -  []  236.52 281.12 0 top
NOREF#458  -  []  159.27 271.67 0 top
NOREF#459  -  []  265.61 192.78 0 top
NOREF#460  -  []  307.65 17.78 0 top
NOREF#461  -  []  209.55 237.49 0 top
NOREF#462  -  []  164.95 207.27 90 top
NOREF#463  -  []  232.25 218.02 0 top
NOREF#464  -  []  249.52 267.27 90 top
NOREF#465  -  []  161.44 184.35 0 top
NOREF#466  -  []  216.83 287.03 0 top
NOREF#467  -  []  275.17 276.75 90 top
NOREF#468  -  []  142.88 286.99 0 top
NOREF#469  -  []  261.55 269.94 90 top
NOREF#470  -  []  178.97 211.91 90 top
NOREF#471  -  []  229.12 256.43 90 top
NOREF#472  -  []  109.55 389.27 90 top
NOREF#473  -  []  161.41 227.9 90 top
NOREF#474  -  []  270.56 252.78 0 top
NOREF#475  -  []  181.55 209.94 90 top
NOREF#476  -  []  237.71 172.86 0 top
NOREF#477  -  []  188.32 245.63 90 top
NOREF#478  -  []  234.33 264.33 90 top
NOREF#479  -  []  219.08 268.59 0 top
NOREF#480  -  []  185.42 214.72 90 top
NOREF#481  -  []  271.76 167.33 0 top
NOREF#482  -  []  249.52 270.32 90 top
NOREF#483  -  []  149.29 286.59 90 top
NOREF#484  -  []  239.4 260.64 90 top
NOREF#485  -  []  232.13 284.66 0 top
NOREF#486  -  []  186.16 212.17 90 top
NOREF#487  -  []  235.68 233.69 90 top
NOREF#488  -  []  233.6 222.39 0 top
NOREF#489  -  []  309.55 14.59 90 top
NOREF#490  -  []  199.4 267.5 90 top
NOREF#491  -  []  220.95 208.91 90 top
NOREF#492  -  []  149.72 286.19 0 top
NOREF#493  -  []  222.81 246.81 0 top
NOREF#494  -  []  187.3 280.35 0 top
NOREF#495  -  []  219.73 238.35 0 top
NOREF#496  -  []  173.64 299.09 0 top
NOREF#497  -  []  235.49 228.7 90 top
NOREF#498  -  []  195.17 216.75 0 top
NOREF#499  -  []  176.98 265.11 90 top
NOREF#500  -  []  175.84 262.57 90 top
NOREF#501  -  []  219.55 240.49 90 top
NOREF#502  -  []  116.51 14.59 90 top
NOREF#503  -  []  214.38 264.09 0 top
NOREF#504  -  []  124.32 231.95 90 top
NOREF#505  -  []  181.6 248.12 0 top
NOREF#506  -  []  256.98 205.11 90 top
NOREF#507  -  []  266.01 195.7 90 top
NOREF#508  -  []  143.36 247.38 0 top
NOREF#509  -  []  206.32 202.32 0 top
NOREF#510  -  []  144.16 256.43 90 top
NOREF#511  -  []  157.04 244.35 0 top
NOREF#512  -  []  266.69 283.04 90 top
NOREF#513  -  []  184.04 245.96 0 top
NOREF#514  -  []  265.09 257.49 90 top
NOREF#515  -  []  260.95 204.09 90 top
NOREF#516  -  []  270.77 283.79 90 top
NOREF#517  -  []  254.38 204.09 0 top
NOREF#518  -  []  262.81 197.6 0 top
NOREF#519  -  []  254.04 210.63 90 top
NOREF#520  -  []  190.41 228.7 90 top
NOREF#521  -  []  124.61 294.89 90 top
NOREF#522  -  []  266.28 193.03 90 top
NOREF#523  -  []  168.42 205.58 0 top
NOREF#524  -  []  203.97 268.95 0 top
NOREF#525  -  []  168.54 207.5 90 top
NOREF#526  -  []  196.8 220.49 90 top
NOREF#527  -  []  189.72 275.77 0 top
NOREF#528  -  []  255.65 184.35 0 top
NOREF#529  -  []  270.6 173.69 0 top
NOREF#530  -  []  170.89 206.13 0 top
NOREF#531  -  []  277.04 184.35 0 top
NOREF#532  -  []  162.85 297.22 0 top
NOREF#533  -  []  232.13 274.25 0 top
NOREF#534  -  []  224.04 245.96 0 top
NOREF#535  -  []  243.84 208.62 0 top
NOREF#536  -  []  149.21 17.15 90 top
NOREF#537  -  []  193.6 286.96 0 top
NOREF#538  -  []  212.64 204.47 0 top
NOREF#539  -  []  163.84 264.78 90 top
NOREF#540  -  []  169.52 264.23 90 top
NOREF#541  -  []  224.16 196.43 90 top
NOREF#542  -  []  232.51 235.77 0 top
NOREF#543  -  []  146.88 280.75 90 top
NOREF#544  -  []  208.54 262.09 0 top
NOREF#545  -  []  266.83 251.93 0 top
NOREF#546  -  []  215.24 201.55 90 top
NOREF#547  -  []  284.95 207.27 90 top
NOREF#548  -  []  138.95 208.91 0 top
NOREF#549  -  []  230.6 233.69 90 top
NOREF#550  -  []  258.35 267.01 0 top
NOREF#551  -  []  167.95 286.12 90 top
NOREF#552  -  []  139.08 268.59 0 top
NOREF#553  -  []  154.62 247.68 90 top
NOREF#554  -  []  270.98 184.35 0 top
NOREF#555  -  []  276.8 214.65 90 top
NOREF#556  -  []  228.35 223.79 90 top
NOREF#557  -  []  159.27 265.58 0 top
NOREF#558  -  []  186.16 286.14 90 top
NOREF#559  -  []  190.97 179.57 90 top
NOREF#560  -  []  185.41 286.99 90 top
NOREF#561  -  []  174.09 260.42 90 top
NOREF#562  -  []  171.65 233.3 90 top
NOREF#563  -  []  173.36 201.22 0 top
NOREF#564  -  []  256.55 194.49 90 top
NOREF#565  -  []  266.43 236.47 90 top
NOREF#566  -  []  243.84 260.97 90 top
NOREF#567  -  []  244.95 260.42 90 top
NOREF#568  -  []  288.54 265.9 0 top
NOREF#569  -  []  193.39 197.85 90 top
NOREF#570  -  []  276.02 192.78 0 top
NOREF#571  -  []  265.61 252.78 0 top
NOREF#572  -  []  156.7 253.03 90 top
NOREF#573  -  []  235.92 190.88 90 top
NOREF#574  -  []  193.27 193.35 0 top
NOREF#575  -  []  195.17 212.18 0 top
NOREF#576  -  []  197.25 196.75 0 top
NOREF#577  -  []  164.61 234.89 90 top
NOREF#578  -  []  142.88 213.02 0 top
NOREF#579  -  []  124.61 234.24 90 top
NOREF#580  -  []  238.91 232.21 90 top
NOREF#581  -  []  195.49 168.7 90 top
NOREF#582  -  []  240.23 236.17 90 top
NOREF#583  -  []  185.41 273.02 90 top
NOREF#584  -  []  139.08 261.22 0 top
NOREF#585  -  []  209.55 237.49 0 top
NOREF#586  -  []  241.12 248.11 90 top
NOREF#587  -  []  246.32 209.17 0 top
NOREF#588  -  []  223.36 187.38 0 top
NOREF#589  -  []  168.45 235.2 0 top
NOREF#590  -  []  163.97 208.95 0 top
NOREF#591  -  []  169.49 280.89 0 top
NOREF#592  -  []  243.97 214.54 0 top
NOREF#593  -  []  220.83 261.22 90 top
NOREF#594  -  []  181.94 389.27 90 top
NOREF#595  -  []  95.33 18.69 0 top
NOREF#596  -  []  275.05 283.39 0 top
NOREF#597  -  []  281.75 202.32 0 top
NOREF#598  -  []  175.11 201.22 90 top
NOREF#599  -  []  260.83 265.79 90 top
NOREF#600  -  []  146.7 237.02 90 top
NOREF#601  -  []  163.84 273.41 90 top
NOREF#602  -  []  288.54 268.95 0 top
NOREF#603  -  []  144.04 251.93 0 top
NOREF#604  -  []  152.72 197.6 0 top
NOREF#605  -  []  197.74 166.36 90 top
NOREF#606  -  []  199.22 255.7 90 top
NOREF#607  -  []  146.28 257.85 90 top
NOREF#608  -  []  180.95 208.91 90 top
NOREF#609  -  []  217.25 176.5 90 top
NOREF#610  -  []  283.84 270.87 90 top
NOREF#611  -  []  189.67 190.01 0 top
NOREF#612  -  []  147.8 205.39 90 top
NOREF#613  -  []  231.71 171.3 0 top
NOREF#614  -  []  197.37 240.3 90 top
NOREF#615  -  []  244.95 267.27 90 top
NOREF#616  -  []  233.03 172.1 0 top
NOREF#617  -  []  154.78 176.5 90 top
NOREF#618  -  []  156.57 185.63 0 top
NOREF#619  -  []  157.25 191.93 0 top
NOREF#620  -  []  233.27 258.18 0 top
NOREF#621  -  []  239.27 204.78 90 top
NOREF#622  -  []  234.39 216.17 90 top
NOREF#623  -  []  218.35 209.04 0 top
NOREF#624  -  []  149.72 281.62 0 top
NOREF#625  -  []  157.74 226.35 90 top
NOREF#626  -  []  245.04 293.3 90 top
NOREF#627  -  []  152.87 188.11 90 top
NOREF#628  -  []  188.32 258.18 0 top
NOREF#629  -  []  168.42 201.77 0 top
NOREF#630  -  []  185.61 192.78 0 top
NOREF#631  -  []  196.5 392.33 90 top
NOREF#632  -  []  196.8 280.49 90 top
NOREF#633  -  []  170.89 262.32 0 top
NOREF#634  -  []  204.95 204.23 90 top
NOREF#635  -  []  201.44 184.35 0 top
NOREF#636  -  []  232.63 173.69 90 top
NOREF#637  -  []  229.12 191.6 90 top
NOREF#638  -  []  95.35 452.29 90 top
NOREF#639  -  []  146.28 197.85 90 top
NOREF#640  -  []  156.57 193.35 0 top
NOREF#641  -  []  141.55 207.14 90 top
NOREF#642  -  []  286.32 212.22 0 top
NOREF#643  -  []  159.27 264.78 90 top
NOREF#644  -  []  276.02 257.6 0 top
NOREF#645  -  []  262.87 213.02 0 top
NOREF#646  -  []  191.98 220.75 90 top
NOREF#647  -  []  277.37 196.43 90 top
NOREF#648  -  []  274.39 286.59 90 top
NOREF#649  -  []  193.18 217.69 90 top
NOREF#650  -  []  229.12 240.3 90 top
NOREF#651  -  []  135.15 260.67 90 top
NOREF#652  -  []  168.42 264.78 90 top
NOREF#653  -  []  237.25 256.75 0 top
NOREF#654  -  []  203.92 289.94 0 top
NOREF#655  -  []  197.71 173.69 0 top
NOREF#656  -  []  153.56 233.37 90 top
NOREF#657  -  []  167.04 239.09 0 top
NOREF#658  -  []  248.54 208.95 0 top
NOREF#659  -  []  152.63 173.69 0 top
NOREF#660  -  []  235.17 272.17 90 top
NOREF#661  -  []  219.73 178.35 0 top
NOREF#662  -  []  221.55 269.94 90 top
NOREF#663  -  []  168.42 260.97 90 top
NOREF#664  -  []  279.72 223.79 90 top
NOREF#665  -  []  279.72 279.22 90 top
NOREF#666  -  []  239.27 214.21 0 top
NOREF#667  -  []  188.35 223.79 90 top
NOREF#668  -  []  133.66 179.15 0 top
NOREF#669  -  []  143.36 187.38 0 top
NOREF#670  -  []  241.12 188.11 90 top
NOREF#671  -  []  192.72 257.6 0 top
NOREF#672  -  []  283.84 274.21 0 top
NOREF#673  -  []  229.84 224.11 0 top
NOREF#674  -  []  159.27 213.41 90 top
NOREF#675  -  []  193.76 195.7 90 top
NOREF#676  -  []  101.95 82.65 0 top
NOREF#677  -  []  272.63 233.69 0 top
NOREF#678  -  []  249.52 207.27 90 top
NOREF#679  -  []  204.44 292.28 90 top
NOREF#680  -  []  159.27 200.97 90 top
NOREF#681  -  []  187.99 178.35 0 top
NOREF#682  -  []  237.71 233.69 0 top
NOREF#683  -  []  244.61 294.24 90 top
NOREF#684  -  []  203.97 212 0 top
NOREF#685  -  []  171.05 289.49 0 top
NOREF#686  -  []  263.36 187.38 0 top
NOREF#687  -  []  152.51 235.77 0 top
NOREF#688  -  []  267.77 197.6 0 top
NOREF#689  -  []  176.98 205.11 90 top
NOREF#690  -  []  159.4 207.5 90 top
NOREF#691  -  []  203.4 236.38 0 top
NOREF#692  -  []  196.7 193.03 90 top
NOREF#693  -  []  155.05 223.39 0 top
NOREF#694  -  []  235.17 216.75 90 top
NOREF#695  -  []  187.77 192.78 0 top
NOREF#696  -  []  197.37 180.3 90 top
NOREF#697  -  []  141.55 202.57 90 top
NOREF#698  -  []  186.28 253.03 90 top
NOREF#699  -  []  188.44 253.03 90 top
NOREF#700  -  []  198.64 233.37 90 top
NOREF#701  -  []  235.96 228.6 90 top
NOREF#702  -  []  128.48 456.29 0 top
NOREF#703  -  []  237.37 191.6 90 top
NOREF#704  -  []  168.42 261.77 0 top
NOREF#705  -  []  228.44 193.03 90 top
NOREF#706  -  []  199.4 260.64 90 top
NOREF#707  -  []  159.06 238.07 0 top
NOREF#708  -  []  195.05 278.82 0 top
NOREF#709  -  []  156.79 171.3 0 top
NOREF#710  -  []  157.37 180.3 90 top
NOREF#711  -  []  187.05 209.24 0 top
NOREF#712  -  []  237.03 238.07 0 top
NOREF#713  -  []  155.17 276.75 0 top
NOREF#714  -  []  211.25 244.35 0 top
NOREF#715  -  []  189.84 224.11 0 top
NOREF#716  -  []  237.04 184.35 0 top
NOREF#717  -  []  118.64 291.4 90 top
NOREF#718  -  []  236.33 227.9 90 top
NOREF#719  -  []  193.76 250.88 90 top
NOREF#720  -  []  230.97 190.88 90 top
NOREF#721  -  []  174.51 263.76 0 top
NOREF#722  -  []  272.11 171.4 0 top
NOREF#723  -  []  269.84 219.54 90 top
NOREF#724  -  []  144.04 256.75 0 top
NOREF#725  -  []  266.83 196.75 0 top
NOREF#726  -  []  199.24 244.35 0 top
NOREF#727  -  []  277.03 238.07 0 top
NOREF#728  -  []  148.35 223.79 90 top
NOREF#729  -  []  191.79 251.93 0 top
NOREF#730  -  []  168.45 295.2 0 top
NOREF#731  -  []  226.7 223.05 90 top
NOREF#732  -  []  190.73 19.69 90 top
NOREF#733  -  []  226.28 197.85 90 top
NOREF#734  -  []  239.4 212 0 top
NOREF#735  -  []  153.39 253.03 90 top
NOREF#736  -  []  241.75 209.17 0 top
NOREF#737  -  []  155.05 214.25 0 top
NOREF#738  -  []  242.2 178.35 0 top
NOREF#739  -  []  229.55 248.99 90 top
NOREF#740  -  []  273.56 233.37 90 top
NOREF#741  -  []  194.33 267.37 90 top
NOREF#742  -  []  278.64 173.37 90 top
NOREF#743  -  []  228.44 197.85 90 top
NOREF#744  -  []  159.27 210.87 90 top
NOREF#745  -  []  283.97 264.45 90 top
NOREF#746  -  []  168.54 202.09 0 top
NOREF#747  -  []  233.18 244.35 0 top
NOREF#748  -  []  216.38 264.09 90 top
NOREF#749  -  []  284.95 204.23 90 top
NOREF#750  -  []  226.83 191.93 0 top
NOREF#751  -  []  150.41 168.7 90 top
NOREF#752  -  []  277.5 245.31 90 top
NOREF#753  -  []  159.4 272 0 top
NOREF#754  -  []  147.8 204.99 90 top
NOREF#755  -  []  219.73 178.35 0 top
NOREF#756  -  []  275.68 173.69 90 top
NOREF#757  -  []  273.6 276.55 0 top
NOREF#758  -  []  227.45 209.24 0 top
NOREF#759  -  []  139.08 201.22 0 top
NOREF#760  -  []  159.27 273.41 90 top
NOREF#761  -  []  236.84 167.33 0 top
NOREF#762  -  []  271.95 238.07 0 top
NOREF#763  -  []  201.75 266.13 0 top
NOREF#764  -  []  179.08 203.76 0 top
NOREF#765  -  []  195.58 262.67 90 top
NOREF#766  -  []  158.91 172.21 90 top
NOREF#767  -  []  228.81 255.7 90 top
NOREF#768  -  []  138.95 264.09 0 top
NOREF#769  -  []  289.52 264.23 90 top
NOREF#770  -  []  196.1 276.42 90 top
NOREF#771  -  []  281.75 262.32 0 top
NOREF#772  -  []  266.28 253.03 90 top
NOREF#773  -  []  189.12 191.6 90 top
NOREF#774  -  []  259.08 201.22 0 top
NOREF#775  -  []  155.05 274.25 0 top
NOREF#776  -  []  208.54 202.09 0 top
NOREF#777  -  []  230.98 244.35 0 top
NOREF#778  -  []  196.61 173.37 90 top
NOREF#779  -  []  271.53 233.37 90 top
NOREF#780  -  []  222.81 252.78 0 top
NOREF#781  -  []  148.19 187.71 0 top
NOREF#782  -  []  283.97 267.5 90 top
NOREF#783  -  []  157.71 173.69 90 top
NOREF#784  -  []  288.42 204.78 90 top
NOREF#785  -  []  133.36 261.22 0 top
NOREF#786  -  []  210.89 269.17 0 top
NOREF#787  -  []  193.56 233.37 90 top
NOREF#788  -  []  274.39 222.02 90 top
NOREF#789  -  []  203.97 274.54 0 top
NOREF#790  -  []  194.39 226.59 90 top
NOREF#791  -  []  283.97 273.09 90 top
NOREF#792  -  []  156.8 214.65 90 top
NOREF#793  -  []  231.11 258.18 0 top
NOREF#794  -  []  154.07 251.6 90 top
NOREF#795  -  []  241.75 212.22 0 top
NOREF#796  -  []  225.41 273.02 90 top
NOREF#797  -  []  272.25 212.18 90 top
NOREF#798  -  []  193.18 184.35 0 top
NOREF#799  -  []  181.55 269.94 90 top
NOREF#800  -  []  147.99 178.35 0 top
NOREF#801  -  []  142.88 273.02 0 top
NOREF#802  -  []  143.49 253.03 90 top
NOREF#803  -  []  196.8 274.65 90 top
NOREF#804  -  []  256.63 292.23 0 top
NOREF#805  -  []  283.84 210.87 90 top
NOREF#806  -  []  239.27 205.58 0 top
NOREF#807  -  []  199.72 219.22 90 top
NOREF#808  -  []  277.71 233.69 0 top
NOREF#809  -  []  132.55 284.49 0 top
NOREF#810  -  []  196.57 193.35 0 top
NOREF#811  -  []  184.16 196.43 90 top
NOREF#812  -  []  208.54 207.5 90 top
NOREF#813  -  []  247.04 299.09 0 top
NOREF#814  -  []  245.38 226.23 0 top
NOREF#815  -  []  279.72 274.65 90 top
NOREF#816  -  []  194.39 216.17 90 top
NOREF#817  -  []  187.43 278.27 0 top
NOREF#818  -  []  237.18 176.17 90 top
NOREF#819  -  []  140.95 206.12 90 top
NOREF#820  -  []  277.71 173.69 90 top
NOREF#821  -  []  153.03 172.1 0 top
NOREF#822  -  []  266.16 212.17 90 top
NOREF#823  -  []  137.28 286.47 90 top
NOREF#824  -  []  114.61 17.78 0 top
NOREF#825  -  []  158.64 233.37 90 top
NOREF#826  -  []  253.24 261.55 0 top
NOREF#827  -  []  152.13 284.66 0 top
NOREF#828  -  []  276.57 193.35 0 top
NOREF#829  -  []  188.32 185.63 90 top
NOREF#830  -  []  247.04 239.09 0 top
NOREF#831  -  []  216.63 232.23 0 top
NOREF#832  -  []  175.24 261.55 90 top
NOREF#833  -  []  281.44 184.35 0 top
NOREF#834  -  []  135.15 265.24 0 top
NOREF#835  -  []  129.36 361.96 0 top
NOREF#836  -  []  244.95 204.23 90 top
NOREF#837  -  []  149.12 180.3 90 top
NOREF#838  -  []  272.72 197.6 0 top
NOREF#839  -  []  269.72 215.77 0 top
NOREF#840  -  []  167.74 456.29 90 top
NOREF#841  -  []  147.77 252.5 0 top
NOREF#842  -  []  258.95 266.12 0 top
NOREF#843  -  []  183.36 198.18 0 top
NOREF#844  -  []  135.43 276.18 0 top
NOREF#845  -  []  152.63 173.69 90 top
NOREF#846  -  []  219.08 205.79 0 top
NOREF#847  -  []  221.85 232.5 0 top
NOREF#848  -  []  227.8 209.99 0 top
NOREF#849  -  []  267.3 220.35 0 top
NOREF#850  -  []  140.83 208.59 90 top
NOREF#851  -  []  188.78 222.65 0 top
NOREF#852  -  []  273.56 173.37 90 top
NOREF#853  -  []  194.07 191.6 90 top
NOREF#854  -  []  129.05 232.28 0 top
NOREF#855  -  []  270.41 228.7 90 top
NOREF#856  -  []  158.11 232.1 0 top
NOREF#857  -  []  159.27 270.87 90 top
NOREF#858  -  []  135.15 263.21 90 top
NOREF#859  -  []  208.94 221.73 0 top
NOREF#860  -  []  191.24 257.85 90 top
NOREF#861  -  []  155.17 281.32 0 top
NOREF#862  -  []  223.49 187.06 90 top
NOREF#863  -  []  267.43 278.27 90 top
NOREF#864  -  []  151.71 171.3 0 top
NOREF#865  -  []  177.25 236.5 90 top
NOREF#866  -  []  162.57 291.95 0 top
NOREF#867  -  []  218.35 269.04 0 top
NOREF#868  -  []  235.96 168.6 90 top
NOREF#869  -  []  236.57 242.05 0 top
NOREF#870  -  []  162.44 232.28 0 top
NOREF#871  -  []  191.98 286.59 90 top
NOREF#872  -  []  203.84 271.67 0 top
NOREF#873  -  []  176.38 264.09 90 top
NOREF#874  -  []  264.16 196.43 90 top
NOREF#875  -  []  155.15 236.17 90 top
NOREF#876  -  []  192.63 173.69 90 top
NOREF#877  -  []  239.27 273.41 90 top
NOREF#878  -  []  237.04 244.35 0 top
NOREF#879  -  []  164.32 291.95 90 top
NOREF#880  -  []  119.48 396.29 0 top
NOREF#881  -  []  84.45 359.42 0 top
NOREF#882  -  []  234.07 251.6 90 top
NOREF#883  -  []  185.61 252.78 0 top
NOREF#884  -  []  150.98 184.35 0 top
NOREF#885  -  []  138.83 232.23 0 top
NOREF#886  -  []  268.44 197.85 90 top
NOREF#887  -  []  209.52 264.23 90 top
NOREF#888  -  []  273.6 222.39 0 top
NOREF#889  -  []  242.2 238.35 0 top
NOREF#890  -  []  284.95 212.86 90 top
NOREF#891  -  []  243.84 267.82 90 top
NOREF#892  -  []  248.94 221.73 0 top
NOREF#893  -  []  153.95 191.93 0 top
NOREF#894  -  []  228.78 184.35 0 top
NOREF#895  -  []  196.33 227.9 90 top
NOREF#896  -  []  192.87 188.11 90 top
NOREF#897  -  []  160.23 176.17 90 top
NOREF#898  -  []  156.57 245.63 0 top
NOREF#899  -  []  194.33 264.33 90 top
NOREF#900  -  []  100.95 17.15 90 top
NOREF#901  -  []  169.05 232.28 0 top
NOREF#902  -  []  229.67 250.01 0 top
NOREF#903  -  []  228.32 185.63 0 top
NOREF#904  -  []  164.64 181.15 90 top
NOREF#905  -  []  233.27 193.35 0 top
NOREF#906  -  []  218.35 207.01 0 top
NOREF#907  -  []  318.12 17.15 90 top
NOREF#908  -  []  236.1 276.42 90 top
NOREF#909  -  []  283.84 205.58 0 top
NOREF#910  -  []  266.01 255.7 90 top
NOREF#911  -  []  148.78 244.35 0 top
NOREF#912  -  []  187.99 178.35 0 top
NOREF#913  -  []  139.08 205.79 0 top
NOREF#914  -  []  199.27 271.67 0 top
NOREF#915  -  []  156.33 167.9 90 top
NOREF#916  -  []  228.78 184.35 0 top
NOREF#917  -  []  276.45 187.71 0 top
NOREF#918  -  []  199.22 195.7 90 top
NOREF#919  -  []  209.55 237.49 0 top
NOREF#920  -  []  239.44 179.15 0 top
NOREF#921  -  []  197.04 184.35 0 top
NOREF#922  -  []  231.24 197.85 90 top
NOREF#923  -  []  161.12 188.11 90 top
NOREF#924  -  []  206.32 212.22 0 top
NOREF#925  -  []  145.42 213.02 90 top
NOREF#926  -  []  147.03 171.4 0 top
NOREF#927  -  []  273.18 184.35 0 top
NOREF#928  -  []  156.84 167.33 0 top
NOREF#929  -  []  214.09 267.27 90 top
NOREF#930  -  []  226.43 282.49 90 top
NOREF#931  -  []  226.7 237.02 90 top
NOREF#932  -  []  242.2 238.35 0 top
NOREF#933  -  []  161.75 214.76 0 top
NOREF#934  -  []  197.37 196.43 90 top
NOREF#935  -  []  273.76 195.7 90 top
NOREF#936  -  []  131.26 184.35 0 top
NOREF#937  -  []  225.41 213.02 90 top
NOREF#938  -  []  196.7 253.03 90 top
NOREF#939  -  []  131.05 289.49 0 top
NOREF#940  -  []  213.65 179.15 0 top
NOREF#941  -  []  187.43 224.11 0 top
NOREF#942  -  []  195.58 202.67 90 top
NOREF#943  -  []  171.05 245.49 90 top
NOREF#944  -  []  241.75 214.76 0 top
NOREF#945  -  []  235.56 235.77 0 top
NOREF#946  -  []  62.86 375.04 0 top
NOREF#947  -  []  149.78 228.3 0 top
NOREF#948  -  []  230.77 213.37 90 top
NOREF#949  -  []  276.54 167 0 top
NOREF#950  -  []  149.72 221.62 0 top
NOREF#951  -  []  249.52 272.86 90 top
NOREF#952  -  []  154.33 204.33 90 top
NOREF#953  -  []  240.13 456.29 90 top
NOREF#954  -  []  203.97 273.09 90 top
NOREF#955  -  []  278.45 14.59 90 top
NOREF#956  -  []  276.1 271.85 90 top
NOREF#957  -  []  149.72 275.77 0 top
NOREF#958  -  []  196.7 181.72 90 top
NOREF#959  -  []  153.95 196.75 0 top
NOREF#960  -  []  249.49 220.89 0 top
NOREF#961  -  []  182.03 229.03 90 top
NOREF#962  -  []  273.39 253.03 90 top
NOREF#963  -  []  262.03 229.03 90 top
NOREF#964  -  []  270.15 206.89 90 top
NOREF#965  -  []  258.97 271.91 90 top
NOREF#966  -  []  141.6 248.12 0 top
NOREF#967  -  []  179.08 263.76 0 top
NOREF#968  -  []  144.16 251.6 90 top
NOREF#969  -  []  148.35 277.95 90 top
NOREF#970  -  []  136.38 264.09 90 top
NOREF#971  -  []  156.79 231.3 0 top
NOREF#972  -  []  106.58 18.69 90 top
NOREF#973  -  []  227.03 231.4 0 top
NOREF#974  -  []  228.78 288.49 0 top
NOREF#975  -  []  156.54 167 0 top
NOREF#976  -  []  143.49 257.85 90 top
NOREF#977  -  []  243.4 236.38 0 top
NOREF#978  -  []  260.59 184.98 90 top
NOREF#979  -  []  151.91 191.6 90 top
NOREF#980  -  []  194.07 196.43 90 top
NOREF#981  -  []  218.95 208.91 0 top
NOREF#982  -  []  234.07 196.43 90 top
NOREF#983  -  []  225.09 257.49 90 top
NOREF#984  -  []  180.95 201.55 90 top
NOREF#985  -  []  170.02 274.45 0 top
NOREF#986  -  []  144.71 247.68 90 top
NOREF#987  -  []  270.88 228.6 90 top
NOREF#988  -  []  227.77 257.6 0 top
NOREF#989  -  []  146.28 253.03 90 top
NOREF#990  -  []  243.97 205.9 0 top
NOREF#991  -  []  150.97 190.88 90 top
NOREF#992  -  []  169.52 207.27 90 top
NOREF#993  -  []  272.87 188.11 90 top
NOREF#994  -  []  140.83 261.22 90 top
NOREF#995  -  []  188.35 283.79 90 top
NOREF#996  -  []  244.95 270.32 90 top
NOREF#997  -  []  209.52 212.86 90 top
NOREF#998  -  []  190.98 184.35 0 top
NOREF#999  -  []  181.55 265.11 90 top
NOREF#1000  -  []  233.6 286.96 0 top
NOREF#1001  -  []  193.83 172.21 90 top
NOREF#1002  -  []  223.36 198.18 0 top
NOREF#1003  -  []  273.94 251.93 0 top
NOREF#1004  -  []  273.03 232.1 0 top
NOREF#1005  -  []  220.95 204.09 90 top
NOREF#1006  -  []  283.84 268.62 0 top
NOREF#1007  -  []  180.83 265.79 90 top
NOREF#1008  -  []  164.61 234.24 90 top
NOREF#1009  -  []  193.6 226.96 0 top
NOREF#1010  -  []  288.42 201.77 0 top
NOREF#1011  -  []  260.83 205.79 90 top
NOREF#1012  -  []  210.89 206.13 0 top
NOREF#1013  -  []  235.92 255.7 90 top
NOREF#1014  -  []  236.02 181.47 0 top
NOREF#1015  -  []  155.17 221.32 90 top
NOREF#1016  -  []  148.99 251.93 0 top
NOREF#1017  -  []  157.59 235.77 0 top
NOREF#1018  -  []  164.61 294.89 90 top
NOREF#1019  -  []  231.79 251.93 0 top
NOREF#1020  -  []  266.01 250.88 90 top
NOREF#1021  -  []  147.8 209.99 0 top
NOREF#1022  -  []  270.97 255.7 90 top
NOREF#1023  -  []  243.97 267.5 90 top
NOREF#1024  -  []  149.72 226.19 0 top
NOREF#1025  -  []  271.98 220.75 90 top
NOREF#1026  -  []  192.25 218.02 90 top
NOREF#1027  -  []  146.96 196.43 90 top
NOREF#1028  -  []  232.13 220.09 0 top
NOREF#1029  -  []  167.74 396.29 0 top
NOREF#1030  -  []  143.36 253.35 0 top
NOREF#1031  -  []  150.88 228.6 90 top
NOREF#1032  -  []  186.01 255.7 90 top
NOREF#1033  -  []  170.89 269.17 0 top
NOREF#1034  -  []  265.42 274.72 90 top
NOREF#1035  -  []  281.12 248.11 90 top
NOREF#1036  -  []  194.33 207.37 90 top
NOREF#1037  -  []  259.55 234.49 0 top
NOREF#1038  -  []  283.84 267.82 90 top
NOREF#1039  -  []  148.19 247.71 0 top
NOREF#1040  -  []  89.76 144.42 90 top
NOREF#1041  -  []  236.84 227.33 0 top
NOREF#1042  -  []  133.36 201.22 0 top
NOREF#1043  -  []  182.03 289.03 90 top
NOREF#1044  -  []  183.49 247.06 90 top
NOREF#1045  -  []  190.6 173.69 90 top
NOREF#1046  -  []  166.32 209.17 0 top
NOREF#1047  -  []  228.44 257.85 90 top
NOREF#1048  -  []  221.55 265.11 90 top
NOREF#1049  -  []  186.7 237.02 90 top
NOREF#1050  -  []  244.44 292.28 90 top
NOREF#1051  -  []  188.44 241.72 90 top
NOREF#1052  -  []  193.76 190.88 90 top
NOREF#1053  -  []  106.83 127.87 90 top
NOREF#1054  -  []  222.81 197.6 0 top
NOREF#1055  -  []  189.84 219.54 0 top
NOREF#1056  -  []  119.48 456.29 0 top
NOREF#1057  -  []  203.84 213.41 90 top
NOREF#1058  -  []  268.78 184.35 0 top
NOREF#1059  -  []  180.59 244.98 90 top
NOREF#1060  -  []  151.76 167.33 0 top
NOREF#1061  -  []  239.27 271.67 0 top
NOREF#1062  -  []  167.04 299.09 0 top
NOREF#1063  -  []  147.3 226.19 0 top
NOREF#1064  -  []  208.54 260.64 90 top
NOREF#1065  -  []  196.8 214.65 90 top
NOREF#1066  -  []  273.94 191.93 0 top
NOREF#1067  -  []  157.92 236.37 90 top
NOREF#1068  -  []  230.77 283.79 90 top
NOREF#1069  -  []  138.56 246.51 0 top
NOREF#1070  -  []  149.67 252.5 90 top
NOREF#1071  -  []  149.84 284.11 90 top
NOREF#1072  -  []  258.35 209.04 0 top
NOREF#1073  -  []  95.35 396.29 0 top
NOREF#1074  -  []  187.3 286.19 0 top
NOREF#1075  -  []  279.72 219.22 90 top
NOREF#1076  -  []  250.89 206.13 0 top
NOREF#1077  -  []  138.74 83.81 0 top
NOREF#1078  -  []  155.78 237.5 90 top
NOREF#1079  -  []  194.33 204.33 90 top
NOREF#1080  -  []  168.54 262.09 0 top
NOREF#1081  -  []  148.95 206.89 0 top
NOREF#1082  -  []  89.74 155.92 0 top
NOREF#1083  -  []  195.68 233.69 0 top
NOREF#1084  -  []  241.75 262.32 0 top
NOREF#1085  -  []  187.99 238.35 0 top
NOREF#1086  -  []  178.35 207.01 0 top
NOREF#1087  -  []  232.25 272.17 90 top
NOREF#1088  -  []  195.92 190.88 90 top
NOREF#1089  -  []  149.12 191.6 90 top
NOREF#1090  -  []  233.56 173.37 90 top
NOREF#1091  -  []  189.55 188.99 90 top
NOREF#1092  -  []  227.43 224.11 90 top
NOREF#1093  -  []  231.91 251.6 90 top
NOREF#1094  -  []  157.71 172.86 0 top
NOREF#1095  -  []  150.97 179.57 90 top
NOREF#1096  -  []  196.81 172.54 0 top
NOREF#1097  -  []  272.63 232.86 0 top
NOREF#1098  -  []  277.71 232.86 0 top
NOREF#1099  -  []  283.97 260.64 90 top
NOREF#1100  -  []  163.84 200.97 90 top
NOREF#1101  -  []  250.89 209.17 0 top
NOREF#1102  -  []  144.16 196.43 90 top
NOREF#1103  -  []  255.11 261.22 90 top
